# Altium PCB NB3000XN.PcbDoc (part 22 of 71)
Units mil, origin at the board's own origin, x right, y up, seen from the top; angles counter-clockwise.
Board outline 9527.56 x 6929.77 mil, 6 copper layers (Top Layer, GND+SHIELD, MidLayer1, MidLayer2, P2 - 3V3+5V0, Bottom Layer), stack 62.375 mil thick; 832 components, 1027 nets, 4655 pads, 4981 vias.
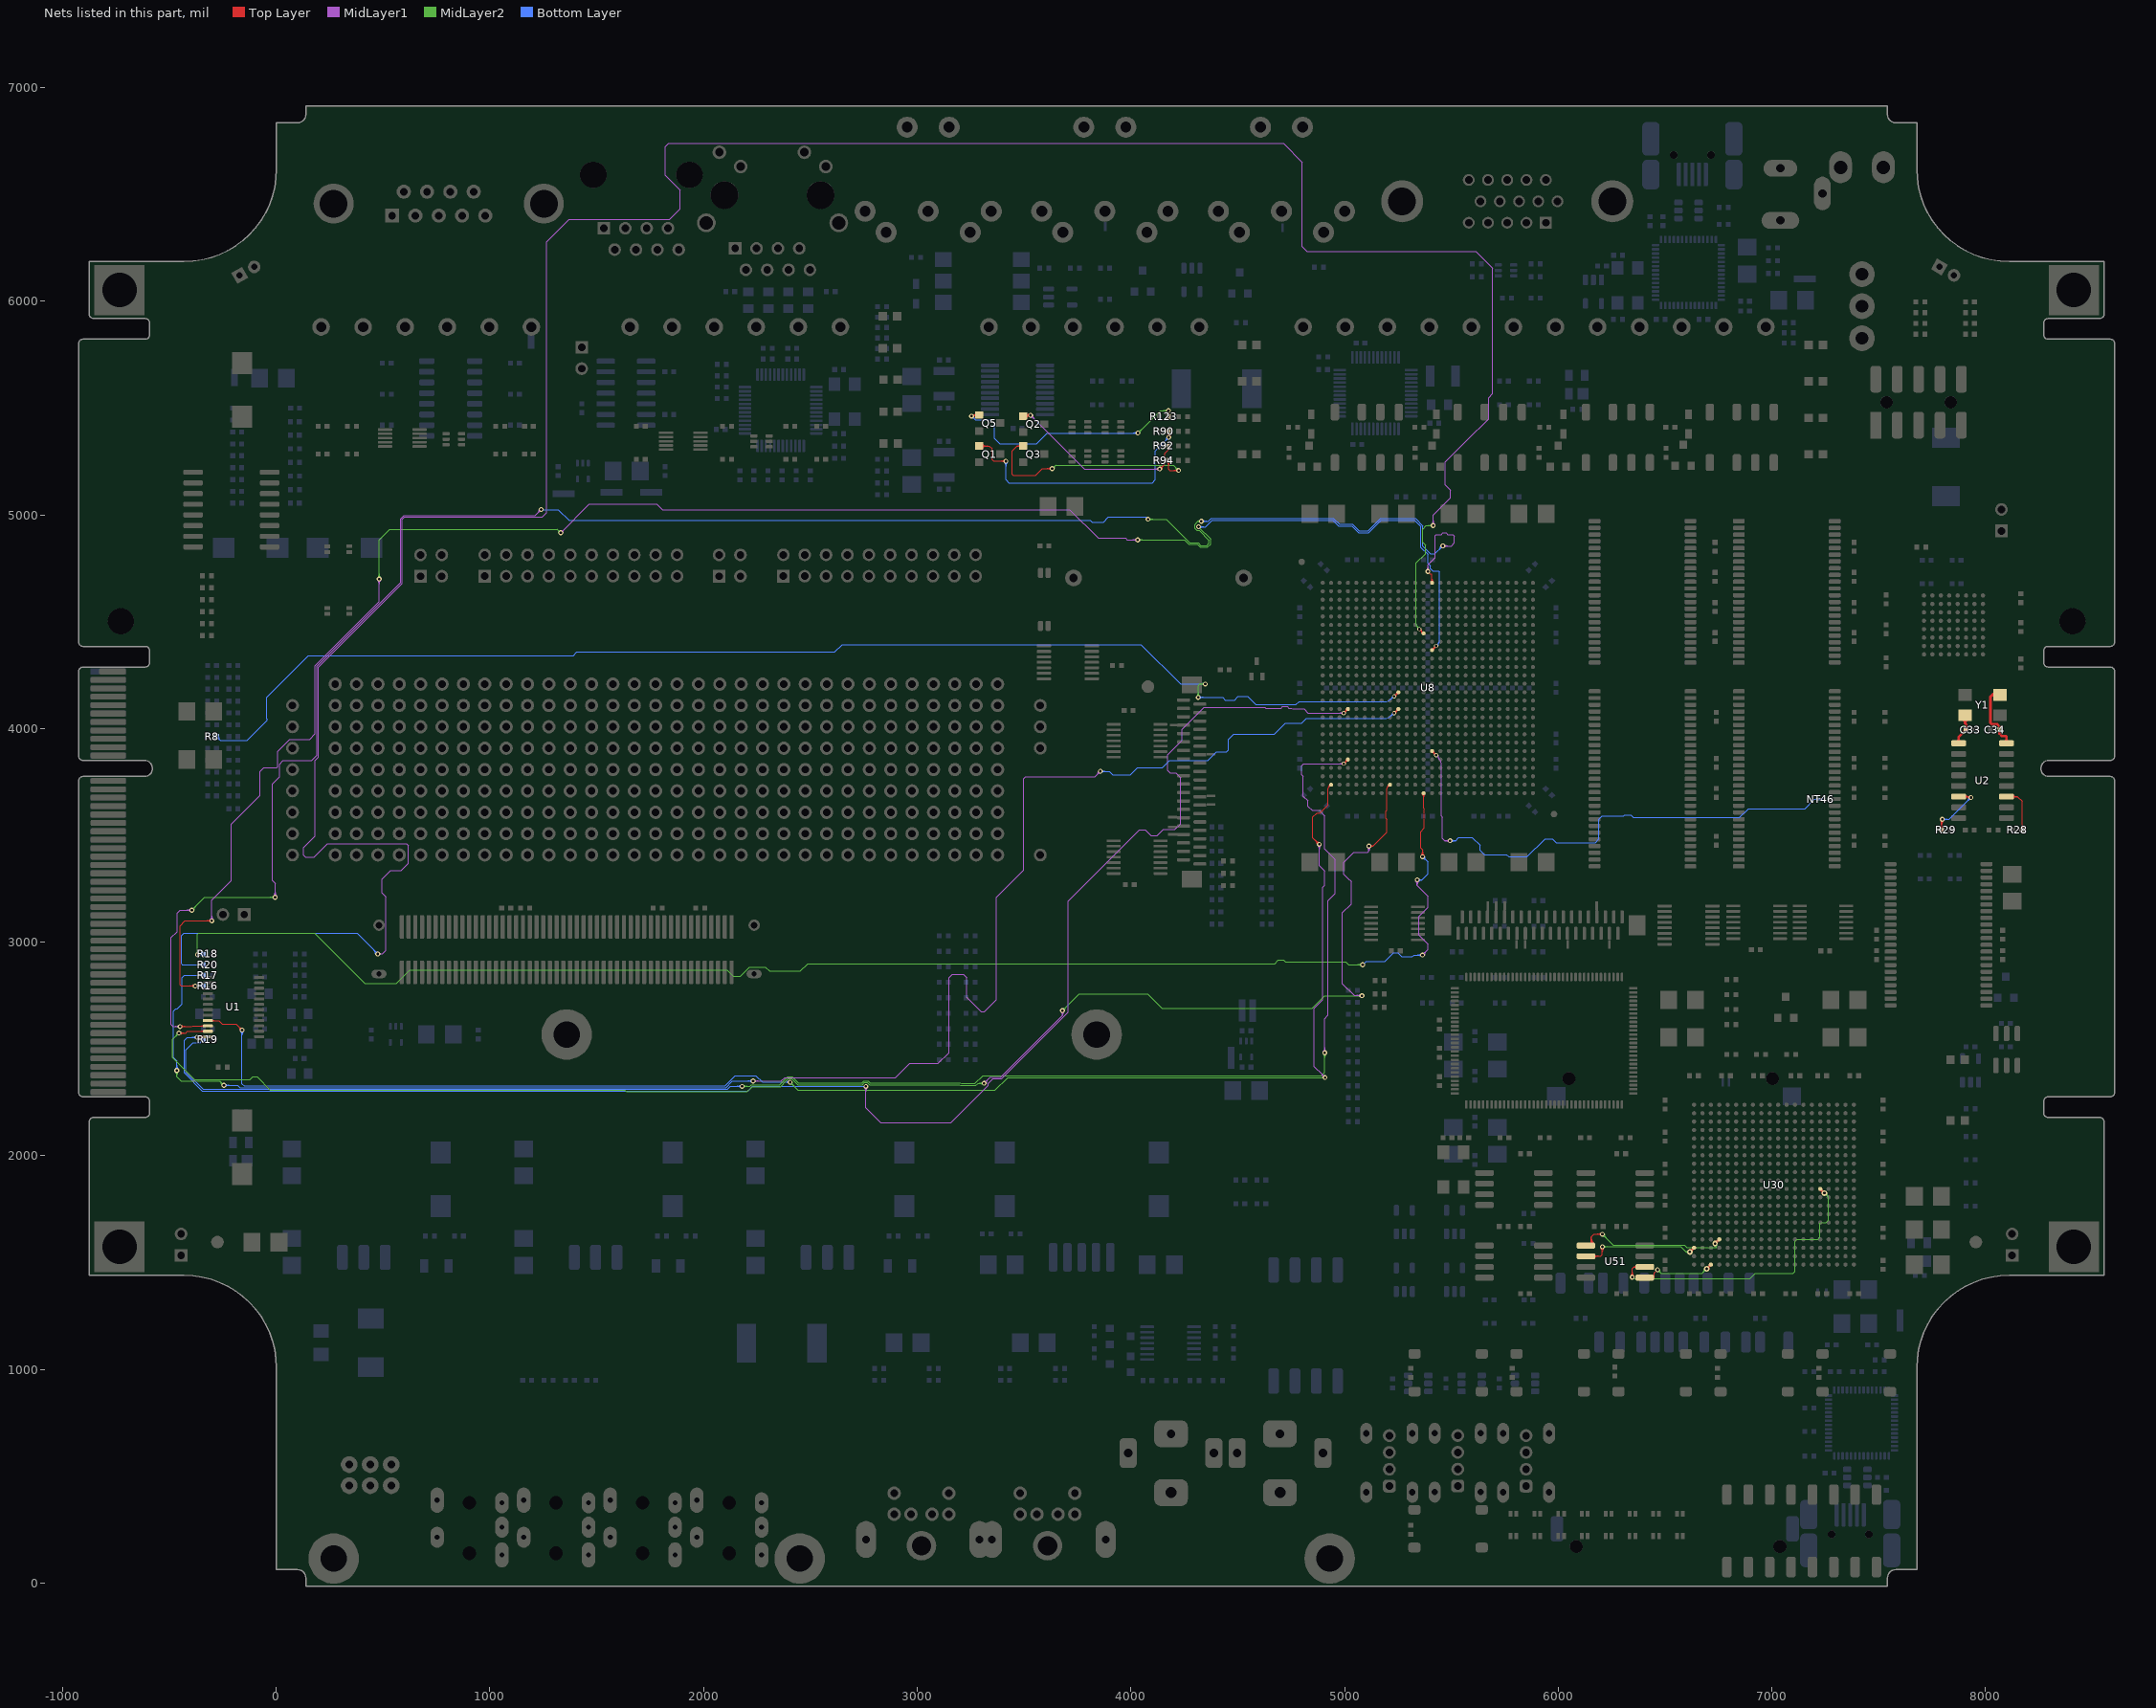
[diagram p26: the nets of this part, all layers, seen from the top]

## Via types
v1: diameter 23, hole 11.81, Top Layer to Bottom Layer, 3672 vias
v2: diameter 26, hole 11.81, Top Layer to Bottom Layer, 461 vias
v3: diameter 19, hole 11.81, Top Layer to Bottom Layer, tented both sides, 396 vias
v4: diameter 23.62, hole 11.81, Top Layer to Bottom Layer, 288 vias
v5: diameter 20, hole 11.81, Top Layer to Bottom Layer, 91 vias
v6: diameter 23, hole 11.81, Top Layer to Bottom Layer, tented both sides, 50 vias
v7: diameter 31, hole 11.81, Top Layer to Bottom Layer, 15 vias
v8: diameter 27.56, hole 11.81, Top Layer to Bottom Layer, tented both sides, 4 vias
v9: diameter 29, hole 11.81, Top Layer to Bottom Layer, 3 vias
v10: diameter 21, hole 11.81, Top Layer to Bottom Layer, 1 vias

## Nets (pads, with @x,y where several pads share a name; then routed paths per layer and width w, separated by ;. In a path a pad name is that pad's centre, name@x,y a point inside that pad or via, vN(x,y) a via of type N, cw(c..) or ccw(c..) an arc to the next point about the centre after c; other vN are vias at no path point) (continued)
BASEA: Q5.1 R123.2 | length 1608.2
  Top Layer w4: v1(3254.52,5462.71) v1@3259.22,5467.4 ; v1@3255.58,5461.65 cw(c3269.48,5447.75) 3269.48,5467.4 ; v1@3258.41,5458.82 cw(c3279.13,5438.1) Q5.1@3279.13,5467.4 ; v1@3261.24,5455.99 cw(c3288.79,5428.44) Q5.1@3288.79,5467.4 ; v1@3261.24,5469.43 ccw(c3266.13,5474.31) 3266.13,5467.4 ; Q5.1@3277.02,5458.25 ccw(c3259.22,5445.5) v1@3259.22,5467.4 ; Q5.1@3277.02,5476.55 cw(c3259.22,5489.3) v1@3259.22,5467.4 ; Q5.1@3280.28,5460.58 ccw(c3267,5451.07) 3267,5467.4 ccw(c3267,5483.73) Q5.1@3280.28,5474.22 ; Q5.1@3290.79,5467.4 v1@3259.22,5467.4 ; R123.2@4169.59,5467.08 ccw(c4153.66,5483.01) v1@4176.19,5483.01 ; v1@4171.65,5479.7 cw(c4167.48,5472.05) 4176.19,5472.05 ; R123.2@4172.42,5464.25 ccw(c4163.32,5473.35) 4176.19,5473.35 ; R123.2@4176.18,5460 4176.18,5472.04 ; 4176.19,5473.31 ccw(c4189,5473.31) R123.2@4179.94,5464.25 ; v1@4176.19,5482.97 ccw(c4198.66,5482.97) R123.2@4182.77,5467.08 ; v1(4176.19,5488.04) 4176.19,5472.05 ; R123.2@4178.17,5469.6 cw(c4178.7,5472.05) 4176.19,5472.05 ; R123.2@4178.15,5469.6 cw(c4178.68,5472.04) 4176.18,5472.04 ; v1@4180.73,5479.7 ccw(c4184.9,5472.05) 4176.19,5472.05 ; 4176.18,5472.04 cw(c4173.68,5472.04) 4174.21,5469.6 ccw(c4173.68,5472.05) 4176.19,5472.05
  MidLayer2 w4: v1(4033.19,5383.37) 4137.86,5488.04 v1(4176.19,5488.04) ; v1@4033.19,5388.87 ccw(c4033.19,5402.15) 4042.58,5392.76 ccw(c4051.97,5383.37) v1@4038.69,5383.37 ; v1@4033.19,5392.87 ccw(c4033.19,5415.81) 4049.41,5399.59 ccw(c4065.63,5383.37) v1@4042.69,5383.37 ; v1@4169.47,5481.32 ccw(c4153.26,5465.11) 4153.26,5488.04 ccw(c4153.26,5510.98) v1@4169.47,5494.76 ; v1@4172.3,5484.15 ccw(c4162.91,5474.76) 4162.91,5488.04 ccw(c4162.91,5501.32) v1@4172.3,5491.93
  Bottom Layer w4: v1@3254.52,5453.21 cw(c3254.52,5430.27) 3270.74,5446.49 cw(c3286.96,5462.71) v1@3264.02,5462.71 ; v1@3254.52,5457.21 cw(c3254.52,5443.93) 3263.91,5453.32 cw(c3273.3,5462.71) v1@3260.02,5462.71 ; v1(3254.52,5462.71) 3272.23,5445 3345,5445 3361.76,5428.24 3361.76,5358.24 3385.72,5334.28 3559.28,5334.28 3608.37,5383.37 v1(4033.19,5383.37) ; v1@4026.47,5376.66 ccw(c4010.26,5360.44) 4010.26,5383.37 ccw(c4010.26,5406.31) v1@4026.47,5390.09 ; v1@4029.3,5379.49 ccw(c4019.91,5370.1) 4019.91,5383.37 ccw(c4019.91,5396.65) v1@4029.3,5387.26
BASEB: Q1.1 R90.2 | length 1645.7
  Top Layer w4: Q1.1@3290.79,5322.4 3337.6,5322.4 3350,5310 3350,5260 3358.29,5251.71 v1(3415.19,5251.71) v1@3414.19,5252.71 ; Q1.1@3297.23,5316.95 cw(c3310.4,5303.77) 3310.4,5322.4 cw(c3310.4,5341.03) Q1.1@3297.23,5327.86 ; Q1.1@3300.06,5314.12 cw(c3320.06,5294.12) 3320.06,5322.4 cw(c3320.06,5350.69) Q1.1@3300.06,5330.69 ; Q1.1@3302.88,5311.29 cw(c3329.71,5284.46) 3329.71,5322.4 cw(c3329.71,5360.34) Q1.1@3302.88,5333.51 ; v1@3408.47,5244.99 ccw(c3392.26,5228.77) 3392.26,5251.71 ccw(c3392.26,5274.64) v1@3408.47,5258.43 ; v1@3411.3,5247.82 ccw(c3401.91,5238.43) 3401.91,5251.71 ccw(c3401.91,5264.99) v1@3411.3,5255.6 ; R90.2@4169.59,5384.59 cw(c4153.68,5368.68) 4176.18,5368.68 cw(c4198.68,5368.68) R90.2@4182.77,5384.59 ; v1@4170.81,5369.43 ccw(c4157.83,5382.4) R90.2@4176.18,5382.4 ; R90.2@4172.42,5387.41 cw(c4163.34,5378.33) 4176.18,5378.33 cw(c4189.02,5378.33) R90.2@4179.94,5387.41 ; 4176.18,5379.23 ccw(c4194.04,5379.23) v1@4181.41,5366.6 ; R90.2@4176.18,5388.89 ccw(c4203.7,5388.89) v1@4184.24,5369.43 ; R90.2@4176.18,5391.67 4176.18,5364.05 v1(4177.52,5362.71)
  Bottom Layer w4: v1@3408.47,5244.99 cw(c3392.26,5228.77) 3415.19,5228.77 cw(c3438.13,5228.77) v1@3421.91,5244.99 ; v1@3411.3,5247.82 cw(c3401.91,5238.43) 3415.19,5238.43 cw(c3428.47,5238.43) v1@3419.08,5247.82 ; v1(3415.19,5251.71) 3415.19,5164.81 3429.81,5150.19 4099.81,5150.19 4115,5165.38 4115,5300.18 v1(4177.52,5362.71) ; v1@4168.02,5362.71 cw(c4145.09,5362.71) 4161.31,5346.49 cw(c4177.52,5330.27) v1@4177.52,5353.21 ; v1@4172.02,5362.71 cw(c4158.75,5362.71) 4168.14,5353.32 cw(c4177.52,5343.93) v1@4177.52,5357.21
BASEC: Q2.1 R92.2 | length 1203.4
  Top Layer w4: Q2.1@3495.79,5462.4 v1@3526.22,5462.4 ; Q2.1@3497.19,5462.4 ccw(c3497.19,5500.04) v1@3523.81,5473.43 ; Q2.1@3506.51,5455.88 cw(c3518.72,5447.7) 3518.72,5462.4 cw(c3518.72,5477.11) Q2.1@3506.51,5468.92 ; Q2.1@3506.85,5462.4 ccw(c3506.85,5490.38) v1@3526.64,5470.6 ; Q2.1@3509.83,5453.66 cw(c3526.22,5442.68) v1@3526.22,5462.4 ; Q2.1@3509.83,5471.15 ccw(c3526.22,5482.13) v1@3526.22,5462.4 ; 3516.51,5462.4 ccw(c3516.51,5480.72) v1@3529.46,5467.77 ; 3517.98,5462.4 cw(c3517.98,5454.17) v1@3523.81,5459.99 ; v1(3530.52,5466.71) v1@3526.22,5462.4 ; v1(4135.19,5215.04) 4158.19,5238.04 4158.19,5287.72 4176.18,5305.71 ; v1@4135.19,5220.54 ccw(c4135.19,5233.82) 4144.58,5224.43 ccw(c4153.97,5215.04) v1@4140.69,5215.04 ; v1@4135.19,5224.54 ccw(c4135.19,5247.48) 4151.41,5231.26 ccw(c4167.63,5215.04) v1@4144.69,5215.04 ; R92.2@4171.12,5315.02 cw(c4165.09,5305.71) 4176.18,5305.71 ; R92.2@4176.18,5323.33 4176.18,5305.71 ; R92.2@4181.24,5315.02 ccw(c4187.27,5305.71) 4176.18,5305.71
  MidLayer1 w4: v1@3530.52,5457.21 cw(c3530.52,5434.27) 3546.74,5450.49 cw(c3562.96,5466.71) v1@3540.02,5466.71 ; v1@3530.52,5461.21 cw(c3530.52,5447.93) 3539.91,5457.32 cw(c3549.3,5466.71) v1@3536.02,5466.71 ; v1(3530.52,5466.71) 3782.19,5215.04 v1(4135.19,5215.04) ; v1@4128.47,5208.32 ccw(c4112.26,5192.11) 4112.26,5215.04 ccw(c4112.26,5237.98) v1@4128.47,5221.76 ; v1@4131.3,5211.15 ccw(c4121.91,5201.76) 4121.91,5215.04 ccw(c4121.91,5228.32) v1@4131.3,5218.93
BASED: Q3.1 R94.2 | length 1413.2
  Top Layer w4: Q3.1@3481.24,5314.47 ccw(c3467.4,5306.37) 3467.4,5322.4 ; Q3.1@3481.24,5330.34 cw(c3467.4,5338.43) 3467.4,5322.4 ; Q3.1@3484.69,5316.49 ccw(c3474.38,5310.45) 3474.38,5322.4 ccw(c3474.38,5334.35) Q3.1@3484.69,5328.32 ; Q3.1@3495.79,5322.4 3467.4,5322.4 ; v1@3625.14,5209.99 ccw(c3608.92,5193.77) 3608.92,5216.71 ccw(c3608.92,5239.64) v1@3625.14,5223.43 ; v1@3627.97,5212.82 ccw(c3618.58,5203.43) 3618.58,5216.71 ccw(c3618.58,5229.99) v1@3627.97,5220.6 ; v1(3631.86,5216.71) 3586.71,5216.71 3555,5185 3450,5185 3445,5190 3445,5300 3467.4,5322.4 ; R94.2@4169.59,5247.92 cw(c4153.68,5232.01) 4176.18,5232.01 cw(c4198.68,5232.01) R94.2@4182.77,5247.92 ; R94.2@4172.42,5250.75 cw(c4163.34,5241.67) 4176.18,5241.67 cw(c4189.02,5241.67) R94.2@4179.94,5250.75 ; R94.2@4176.18,5255 4176.18,5213.82 4181.63,5208.37 v1(4223.52,5208.37) ; v1@4216.81,5201.66 ccw(c4200.59,5185.44) 4200.59,5208.37 ccw(c4200.59,5231.31) v1@4216.81,5215.09 ; v1@4219.64,5204.49 ccw(c4210.25,5195.1) 4210.25,5208.37 ccw(c4210.25,5221.65) v1@4219.64,5212.26
  MidLayer2 w4: v1(3631.86,5216.71) 3648.52,5233.37 4198.52,5233.37 v1(4223.52,5208.37) ; v1@3631.86,5222.21 ccw(c3631.86,5235.49) 3641.25,5226.1 ccw(c3650.64,5216.71) v1@3637.36,5216.71 ; v1@3631.86,5226.21 ccw(c3631.86,5249.14) 3648.07,5232.93 ccw(c3664.29,5216.71) v1@3641.36,5216.71 ; v1@4214.02,5208.37 ccw(c4191.09,5208.37) 4207.31,5224.59 ccw(c4223.52,5240.81) v1@4223.52,5217.87 ; v1@4218.02,5208.37 ccw(c4204.75,5208.37) 4214.14,5217.76 ccw(c4223.52,5227.15) v1@4223.52,5213.87
BOOT_FLASH.DIN: U30.V20 U51.5 | length 550.9
  Top Layer w4: U51.5@6405.59,1430 6449.79,1430 ; U51.5@6446.62,1427.45 cw(c6449.79,1426.75) 6449.79,1430 ; U51.5@6446.62,1432.55 ccw(c6449.79,1433.25) 6449.79,1430 ; v1(6465.19,1466.71) 6449.79,1451.31 6449.79,1430
  Top Layer w8: v2(6695.04,1471.3) U30.V20@6714.72,1490.98 ; v2@6695.04,1480.3 ccw(c6695.04,1502.03) 6710.4,1486.66 ccw(c6725.77,1471.3) v2@6704.04,1471.3 ; U30.V20@6708.88,1490.98 cw(c6694.78,1490.98) 6704.75,1481.01 cw(c6714.72,1471.04) U30.V20@6714.72,1485.14
  MidLayer2 w4: v1@6465.19,1457.21 cw(c6465.19,1434.27) 6481.41,1450.49 cw(c6497.63,1466.71) v1@6474.69,1466.71 ; v1@6465.19,1461.21 cw(c6465.19,1447.93) 6474.58,1457.32 cw(c6483.97,1466.71) v1@6470.69,1466.71 ; v1(6465.19,1466.71) 6481.86,1450.04 6673.78,1450.04 v2(6695.04,1471.3) ; 6683.09,1459.35 ccw(c6671.14,1471.3) v2@6688.04,1471.3 ; 6683.09,1459.35 cw(c6695.04,1447.4) v2@6695.04,1464.3 ; v2@6684.04,1471.3 cw(c6657.48,1471.3) 6676.26,1452.52 cw(c6695.04,1433.75) v2@6695.04,1460.3
BOOT_FLASH.DOUT: U30.Y18 U51.2 | length 828.4
  Top Layer w4: U51.2@6130,1530 6200,1530 6206.86,1536.86 v1(6206.86,1574.37) ; U51.2@6165.03,1524.5 cw(c6178.31,1511.22) 6178.31,1530 cw(c6178.31,1548.78) U51.2@6165.03,1535.5 ; U51.2@6167.86,1521.67 cw(c6187.97,1501.56) 6187.97,1530 cw(c6187.97,1558.44) U51.2@6167.86,1538.33 ; v1@6200.14,1567.66 cw(c6183.92,1551.44) 6206.86,1551.44 cw(c6229.79,1551.44) v1@6213.57,1567.66 ; v1@6202.97,1570.49 cw(c6193.58,1561.1) 6206.86,1561.1 cw(c6220.14,1561.1) v1@6210.75,1570.49
  Top Layer w8: v2(6616.3,1550.04) U30.Y18@6635.98,1569.72 ; v2@6616.3,1559.04 ccw(c6616.3,1580.77) 6631.66,1565.4 ccw(c6647.03,1550.04) v2@6625.3,1550.04 ; U30.Y18@6630.14,1569.72 cw(c6616.04,1569.72) 6626.01,1559.75 cw(c6635.98,1549.78) U30.Y18@6635.98,1563.88
  MidLayer2 w4: v1(6206.86,1574.37) 6574.19,1574.37 6598.52,1550.04 ; v1@6210.75,1570.49 cw(c6220.14,1561.1) 6220.14,1574.37 cw(c6220.14,1587.65) v1@6210.75,1578.26 ; v1@6213.57,1567.66 cw(c6229.79,1551.44) 6229.79,1574.37 cw(c6229.79,1597.31) v1@6213.57,1581.09 ; v2@6606.45,1545.13 ccw(c6598.52,1541.18) 6598.52,1550.04 ; v2@6606.45,1554.95 cw(c6598.52,1558.9) 6598.52,1550.04 ; v2(6616.3,1550.04) 6598.52,1550.04
BOOT_FLASH.FLASH_CS_N: U30.U17 U51.1 | length 1022.1
  Top Layer w4: U51.1@6130,1580 6154.52,1580 6154.52,1619.52 ; U51.1@6151.2,1588.33 ccw(c6143.17,1596.36) 6154.52,1596.36 ; 6154.52,1600.68 ccw(c6179.49,1600.68) U51.1@6162.15,1582.72 ; 6154.52,1610.1 ccw(c6188.58,1610.1) U51.1@6164.93,1585.6 ; U51.1@6167.71,1588.48 cw(c6197.67,1619.52) 6154.52,1619.52 ; v1@6200.14,1626.66 ccw(c6183.92,1610.44) 6183.92,1633.37 ccw(c6183.92,1656.31) v1@6200.14,1640.09 ; v1@6202.97,1629.49 ccw(c6193.58,1620.1) 6193.58,1633.37 ccw(c6193.58,1646.65) v1@6202.97,1637.26 ; v1(6206.86,1633.37) 6168.37,1633.37 6154.52,1619.52
  Top Layer w8: v2(6734.41,1589.41) U30.U17@6754.09,1609.09 ; v2@6734.41,1598.41 ccw(c6734.41,1620.14) 6749.77,1604.77 ccw(c6765.14,1589.41) v2@6743.41,1589.41 ; U30.U17@6748.25,1609.09 cw(c6734.15,1609.09) 6744.12,1599.12 cw(c6754.09,1589.15) U30.U17@6754.09,1603.25
  MidLayer2 w4: v1@6206.86,1623.87 cw(c6206.86,1600.94) 6223.07,1617.16 cw(c6239.29,1633.37) v1@6216.36,1633.37 ; v1@6206.86,1627.87 cw(c6206.86,1614.6) 6216.25,1623.99 cw(c6225.64,1633.37) v1@6212.36,1633.37 ; v1(6206.86,1633.37) 6257.52,1582.71 6590.19,1582.71 6602.86,1570.04 6738.52,1570.04 6740.19,1571.71 6740.19,1589.41 v2(6734.41,1589.41) ; v2@6733.27,1578.47 cw(c6732.47,1570.79) 6740.19,1570.79 ; v2@6733.68,1582.45 cw(c6732.93,1575.23) 6740.19,1575.23 ; 6740.19,1576.81 cw(c6747.01,1576.81) v2@6742.19,1581.63
BOOT_FLASH.SCLK: U30.E11 U51.6 | length 1649.6
  Top Layer w4: v1@6339.47,1439.09 ccw(c6323.26,1455.31) 6346.19,1455.31 ccw(c6369.13,1455.31) v1@6352.91,1439.09 ; v1@6342.3,1436.26 ccw(c6332.91,1445.65) 6346.19,1445.65 ccw(c6359.47,1445.65) v1@6350.08,1436.26 ; v1(6346.19,1432.37) 6346.19,1472 6354.19,1480 ; U51.6@6366.23,1473.52 ccw(c6354.19,1465.58) 6354.19,1480 ; U51.6@6366.23,1486.48 cw(c6354.19,1494.42) 6354.19,1480 ; U51.6@6369.57,1475.72 ccw(c6361.62,1470.48) 6361.62,1480 ccw(c6361.62,1489.52) U51.6@6369.57,1484.28 ; U51.6@6405.59,1480 6354.19,1480
  Top Layer w8: U30.E11@7226.54,1839.47 cw(c7226.54,1825.37) 7236.51,1835.34 cw(c7246.48,1845.31) U30.E11@7232.38,1845.31 ; U30.E11@7226.54,1845.31 v2(7246.22,1825.63) ; v2@7237.22,1825.63 ccw(c7215.49,1825.63) 7230.86,1840.99 ccw(c7246.22,1856.36) v2@7246.22,1834.63
  MidLayer2 w4: v1(6346.19,1432.37) 6353.52,1425.04 6898.52,1425.04 6923.52,1450.04 7100.19,1450.04 7108.52,1458.37 7108.52,1600 7118.3,1609.78 7214.78,1609.78 7225.85,1620.85 7225.85,1685.85 7228.52,1688.52 7254.09,1688.52 7265.22,1699.65 7265.22,1806.63 v2(7246.22,1825.63) ; v2@7246.22,1814.63 cw(c7246.22,1788.07) 7265,1806.85 cw(c7283.78,1825.63) v2@7257.22,1825.63 ; v2@7246.22,1818.63 cw(c7246.22,1801.73) 7258.17,1813.68 cw(c7270.12,1825.63) v2@7253.22,1825.63
BUS_SDRAM_FEEDBACK: NT46.1 U8.AA14 | length 2690.9
  Top Layer w4: U8.AA14@5409.69,3887.22 cw(c5409.69,3869.12) 5422.49,3881.92 cw(c5435.29,3894.72) U8.AA14@5417.19,3894.72 ; U8.AA14@5409.69,3887.38 cw(c5409.69,3869.66) 5422.22,3882.19 cw(c5434.75,3894.72) U8.AA14@5417.03,3894.72 ; U8.AA14@5409.69,3894.72 v3(5429.37,3875.04) ; 5416.57,3887.84 cw(c5403.76,3875.04) 5421.87,3875.04 ccw(c5403.76,3875.04) 5416.57,3887.84 ; 5416.57,3887.84 ccw(c5429.37,3900.65) 5429.37,3882.54 cw(c5429.37,3900.65) 5416.57,3887.84
  MidLayer1 w4: v3@5428.72,3867.57 cw(c5427.14,3849.53) 5441.01,3861.17 ; v3@5436.84,3874.39 ccw(c5454.88,3872.81) 5441.01,3861.17 ; v1@5487.81,3468.32 ccw(c5471.59,3452.11) 5471.59,3475.04 ccw(c5471.59,3497.98) v1@5487.81,3481.76 ; v1@5490.64,3471.15 ccw(c5481.25,3461.76) 5481.25,3475.04 ccw(c5481.25,3488.32) v1@5490.64,3478.93 ; v1(5494.52,3475.04) 5469.96,3475.04 5458.5,3486.5 5458.5,3585.18 5453.23,3590.45 5453.23,3660 5453.23,3670 5453.23,3738.04 5453.23,3812.16 5453.23,3831.66 ccw(c5411.5,3831.66) 5441.01,3861.17
  Bottom Layer w4: v1(5494.52,3475.04) 5520.04,3475.04 5535,3490 5597.27,3490 5633.9,3453.37 5633.9,3429.79 5654.6,3409.08 5759.13,3409.08 5768.17,3400.04 5855,3400.04 5938.83,3483.87 5973.34,3483.87 5991.17,3466.04 6173.52,3466.04 6190.19,3482.71 6190.19,3575.04 6206.86,3591.71 6306.86,3591.71 6310.15,3595 6340,3595 6351.63,3583.37 6848.52,3583.37 6890.19,3625.04 7155.04,3625.04 7199,3669 NT46.1@7219,3669 ; v1@5498.41,3471.15 cw(c5507.8,3461.76) 5507.8,3475.04 cw(c5507.8,3488.32) v1@5498.41,3478.93 ; v1@5501.24,3468.32 cw(c5517.46,3452.11) 5517.46,3475.04 cw(c5517.46,3497.98) v1@5501.24,3481.76 ; NT46.1@7211.67,3666.17 ccw(c7204.84,3659.34) 7204.84,3669 ccw(c7204.84,3678.66) NT46.1@7211.67,3671.83
BUZZER: R8.1 U8.P10 | length 6445.2
  Top Layer w4: v3(5232.52,4150.63) U8.P10@5252.2,4170.31 ; U8.P10@5244.7,4170.31 cw(c5226.6,4170.31) 5239.4,4157.51 cw(c5252.2,4144.71) U8.P10@5252.2,4162.81 ; U8.P10@5244.86,4170.31 cw(c5227.14,4170.31) 5239.67,4157.78 cw(c5252.2,4145.25) U8.P10@5252.2,4162.97 ; 5245.32,4163.43 cw(c5232.52,4176.24) 5232.52,4158.13 ccw(c5232.52,4176.24) 5245.32,4163.43 ; 5245.32,4163.43 ccw(c5258.13,4150.63) 5240.02,4150.63 cw(c5258.13,4150.63) 5245.32,4163.43
  MidLayer2 w4: v1@4308.47,4152.43 ccw(c4292.26,4168.64) 4315.19,4168.64 ccw(c4338.13,4168.64) v1@4321.91,4152.43 ; v1@4311.3,4149.6 ccw(c4301.91,4158.99) 4315.19,4158.99 ccw(c4328.47,4158.99) v1@4319.08,4149.6 ; v1(4315.19,4145.71) 4315.19,4200.19 4323.37,4208.37 v1(4348.52,4208.37) ; v1@4341.81,4201.66 ccw(c4325.59,4185.44) 4325.59,4208.37 ccw(c4325.59,4231.31) v1@4341.81,4215.09 ; v1@4344.64,4204.49 ccw(c4335.25,4195.1) 4335.25,4208.37 ccw(c4335.25,4221.65) v1@4344.64,4212.26
  Bottom Layer w4: R8.1@-278.82,3952.46 cw(c-278.82,3928.78) -262.07,3945.52 ; R8.1@-278.82,3956.46 cw(c-278.82,3942.43) R8.1@-268.9,3952.35 ; R8.1@-278.82,3962.27 -261.01,3944.46 -136.08,3944.46 -42.65,4037.9 -42.65,4044.19 -43.48,4045.02 -43.48,4146.73 151.51,4341.71 1390.19,4341.71 1406.86,4358.37 2615,4358.37 2648.67,4392.04 4048.23,4392.04 4231.9,4208.37 v1(4348.52,4208.37) ; R8.1@-273.5,3961.78 ccw(c-261.85,3961.78) R8.1@-270.09,3953.54 ; R8.1@-269.5,3961.78 ccw(c-248.19,3961.78) -263.26,3946.71 ; v1(4315.19,4145.71) 4429.33,4145.71 4441.33,4133.71 4485.17,4133.71 4501.5,4150.04 4545.54,4150.04 4583.67,4111.92 4773.38,4111.92 4788.23,4126.77 4860,4126.77 4870,4126.77 5076.1,4126.77 5095.52,4126.77 5169.64,4126.77 5189.14,4126.77 ccw(c5189.14,4168.5) 5218.65,4138.99 ; v1@4319.08,4141.82 cw(c4328.47,4132.43) 4328.47,4145.71 cw(c4328.47,4158.99) v1@4319.08,4149.6 ; v1@4321.91,4138.99 cw(c4338.13,4122.77) 4338.13,4145.71 cw(c4338.13,4168.64) v1@4321.91,4152.43 ; v1@4341.81,4201.66 ccw(c4325.59,4185.44) 4325.59,4208.37 ccw(c4325.59,4231.31) v1@4341.81,4215.09 ; v1@4344.64,4204.49 ccw(c4335.25,4195.1) 4335.25,4208.37 ccw(c4335.25,4221.65) v1@4344.64,4212.26 ; v3@5225.05,4151.28 cw(c5207.01,4152.86) 5218.65,4138.99 ; v3@5231.87,4143.16 ccw(c5230.29,4125.12) 5218.65,4138.99
CLK_ADJ_X1: C33.1 U2.1 Y1.1 | length 268.3
  Top Layer w12: U2.1@7868.67,3936.84 ccw(c7855.39,3950.12) 7874.17,3950.12 ccw(c7892.95,3950.12) U2.1@7879.67,3936.84 ; U2.1@7874.17,3931.34 7874.17,3959.84 C33.1@7909.33,3995 7909.33,4020 7904.88,4024.45 ; Y1.1@7893.79,4044.08 cw(c7881.97,4024.45) 7904.88,4024.45 ; C33.1@7903.52,3995 cw(c7889.49,3995) 7899.41,3985.08 cw(c7909.33,3975.16) C33.1@7909.33,3989.19 ; Y1.1@7904.88,4062.5 7904.88,4024.45 ; C33.1@7905.22,3999.11 ccw(c7895.3,4009.03) 7909.33,4009.03 ccw(c7923.36,4009.03) C33.1@7913.44,3999.11 ; Y1.1@7915.97,4044.08 ccw(c7927.79,4024.45) 7904.88,4024.45
CLK_ADJ_X2: C34.1 U2.16 Y1.3 | length 554.6
  Top Layer w12: 8024.1,4150.07 cw(c8040.99,4133.17) Y1.3@8057.37,4150.58 ; 8029.17,4155.15 cw(c8050.06,4134.26) Y1.3@8065.16,4159.65 ; 8032.85,4158.82 cw(c8049.48,4142.19) Y1.3@8065.59,4159.32 ; Y1.3@8044.06,4149.17 ccw(c8031.53,4143.91) 8031.53,4157.5 ; Y1.3@8044.06,4165.83 cw(c8031.53,4171.09) 8031.53,4157.5 ; C34.1@8061.56,3990.89 cw(c8051.64,3980.97) 8065.67,3980.97 cw(c8079.7,3980.97) C34.1@8069.78,3990.89 ; C34.1@8061.56,3999.11 ccw(c8051.64,4009.03) 8065.67,4009.03 ccw(c8079.7,4009.03) C34.1@8069.78,3999.11 ; 8066.65,4008.35 cw(c8054.02,3995.72) C34.1@8071.85,3994.62 ; Y1.3@8067.88,4157.5 8031.52,4157.5 ; U2.16@8093.08,3936.84 ccw(c8079.8,3950.12) 8098.58,3950.12 ccw(c8117.36,3950.12) U2.16@8104.08,3936.84 ; U2.16@8098.58,3931.34 8098.58,3961.42 8095,3965 8077.29,3965 8065.67,3976.62 C34.1@8065.67,3995 8065.67,4009.33 8055,4020 8030,4020 8023.52,4026.48 8023.52,4149.5 8031.52,4157.5
CLK_FIXED#: R29.2 U2.6 | length 669.3
  Top Layer w4: R29.2@7787.23,3532.08 ccw(c7771.32,3547.99) 7793.82,3547.99 ccw(c7816.32,3547.99) R29.2@7800.41,3532.08 ; R29.2@7790.06,3529.25 ccw(c7780.98,3538.33) 7793.82,3538.33 ccw(c7806.66,3538.33) R29.2@7797.58,3529.25 ; v1@7790.81,3568.32 cw(c7783.53,3561.05) 7793.82,3561.05 ; R29.2@7793.82,3525 7793.82,3571.34 v1(7797.52,3575.04) ; 7793.82,3543.16 cw(c7829.4,3543.16) v1@7804.24,3568.32 ; 7793.82,3552.82 cw(c7819.75,3552.82) v1@7801.41,3571.15 ; 7793.82,3562.47 cw(c7810.09,3562.47) v1@7798.58,3573.98 ; U2.6@7874.17,3681.34 v1@7923.82,3681.34 ; U2.6@7899.35,3681.34 cw(c7899.35,3644.87) v1@7925.14,3670.66 ; U2.6@7901.39,3675.9 cw(c7914.31,3663.26) 7914.31,3681.34 cw(c7914.31,3699.42) U2.6@7901.39,3686.78 ; U2.6@7904.25,3673.1 cw(c7923.82,3653.97) v1@7923.82,3681.34 ; U2.6@7904.25,3689.57 ccw(c7923.82,3708.71) v1@7923.82,3681.34 ; U2.6@7909.01,3681.34 cw(c7909.01,3654.53) v1@7927.97,3673.49 ; 7918.49,3681.34 ccw(c7918.49,3690.74) v1@7925.14,3684.09 ; 7918.67,3681.34 cw(c7918.67,3664.18) v1@7930.8,3676.31 ; v1(7931.86,3677.37) 7927.52,3681.71 7924.19,3681.71 v1@7923.82,3681.34
  Bottom Layer w4: v1(7797.52,3575.04) 7829.52,3575.04 v1(7931.86,3677.37) ; v1@7801.41,3571.15 cw(c7810.8,3561.76) 7810.8,3575.04 cw(c7810.8,3588.32) v1@7801.41,3578.93 ; v1@7804.24,3568.32 cw(c7820.46,3552.11) 7820.46,3575.04 cw(c7820.46,3597.98) v1@7804.24,3581.76 ; v1@7922.36,3677.37 cw(c7899.42,3677.37) 7915.64,3661.16 cw(c7931.86,3644.94) v1@7931.86,3667.87 ; v1@7926.36,3677.37 cw(c7913.08,3677.37) 7922.47,3667.99 cw(c7931.86,3658.6) v1@7931.86,3671.87
CLK_PROG#: R28.2 U2.11 | length 346.5
  Top Layer w4: U2.11@8098.58,3681.34 8150.56,3681.34 8171.18,3660.72 R28.2@8171.18,3525 ; U2.11@8125.74,3675.84 cw(c8139.02,3662.56) 8139.02,3681.34 cw(c8139.02,3700.12) U2.11@8125.74,3686.84 ; U2.11@8128.57,3673.01 cw(c8148.67,3652.9) 8148.67,3681.34 cw(c8148.67,3709.78) U2.11@8128.57,3689.67 ; R28.2@8164.59,3532.08 ccw(c8148.68,3547.99) 8171.18,3547.99 ccw(c8193.68,3547.99) R28.2@8177.77,3532.08 ; R28.2@8167.42,3529.25 ccw(c8158.34,3538.33) 8171.18,3538.33 ccw(c8184.02,3538.33) R28.2@8174.94,3529.25
CODEC.I2S_BCLK: R16.2 U8.J14 | length 9481.9
  Top Layer w4: v1@-385.9,2788.28 ccw(c-402.11,2772.06) -402.11,2795 ccw(c-402.11,2817.93) v1@-385.9,2801.72 ; v1@-383.07,2791.11 ccw(c-392.46,2781.72) -392.46,2795 ccw(c-392.46,2808.28) v1@-383.07,2798.89 ; v1(-379.18,2795) -445,2795 -450,2800 -450,3076.52 -426.48,3100.04 v1(-301.48,3100.04) ; v1@-308.19,3093.32 ccw(c-324.41,3077.11) -324.41,3100.04 ccw(c-324.41,3122.98) v1@-308.19,3106.76 ; v1@-305.36,3096.15 ccw(c-314.75,3086.76) -314.75,3100.04 ccw(c-314.75,3113.32) v1@-305.36,3103.93 ; U8.J14@5409.69,4367.17 v3(5429.37,4386.85) ; U8.J14@5409.69,4374.51 ccw(c5409.69,4392.23) 5422.22,4379.7 ccw(c5434.75,4367.17) U8.J14@5417.03,4367.17 ; U8.J14@5409.69,4374.67 ccw(c5409.69,4392.77) 5422.49,4379.97 ccw(c5435.29,4367.17) U8.J14@5417.19,4367.17 ; 5416.57,4374.05 cw(c5429.37,4361.24) 5429.37,4379.35 ccw(c5429.37,4361.24) 5416.57,4374.05 ; 5416.57,4374.05 ccw(c5403.76,4386.85) 5421.87,4386.85 cw(c5403.76,4386.85) 5416.57,4374.05
  MidLayer1 w4: v1@-308.19,3106.76 ccw(c-324.41,3122.98) -301.48,3122.98 ccw(c-278.54,3122.98) v1@-294.76,3106.76 ; v1@-305.36,3103.93 ccw(c-314.75,3113.32) -301.48,3113.32 ccw(c-288.2,3113.32) v1@-297.59,3103.93 ; v1(-301.48,3100.04) -301.48,3197.06 -210,3288.54 -210,3552.37 -80.21,3682.16 -75.3,3687.07 -75.3,3790 ; -75,3790 -75,3800 -58.29,3816.71 1.71,3816.71 7.19,3822.19 7.19,3893.67 63.56,3950.04 156.86,3950.04 181.86,3975.04 181.86,4294.69 481.86,4594.69 v1(481.86,4700.04) ; v1@475.14,4693.32 cw(c458.92,4677.11) 481.86,4677.11 cw(c504.79,4677.11) v1@488.57,4693.32 ; v1@477.97,4696.15 cw(c468.58,4686.76) 481.86,4686.76 cw(c495.14,4686.76) v1@485.75,4696.15 ; v1(1331.86,4916.71) 1465.19,5050.04 1781.86,5050.04 1806.86,5025.04 3713.65,5025.04 3846.98,4891.71 3974.51,4891.71 3982.84,4883.37 v1(4031.86,4883.37) ; v1@1331.86,4922.21 ccw(c1331.86,4935.49) 1341.25,4926.1 ccw(c1350.64,4916.71) v1@1337.36,4916.71 ; v1@1331.86,4926.21 ccw(c1331.86,4949.14) 1348.07,4932.93 ccw(c1364.29,4916.71) v1@1341.36,4916.71 ; v1@4025.14,4876.66 ccw(c4008.92,4860.44) 4008.92,4883.37 ccw(c4008.92,4906.31) v1@4025.14,4890.09 ; v1@4027.97,4879.49 ccw(c4018.58,4870.1) 4018.58,4883.37 ccw(c4018.58,4896.65) v1@4027.97,4887.26
  MidLayer2 w4: v1@475.14,4706.76 ccw(c458.92,4722.98) 481.86,4722.98 ccw(c504.79,4722.98) v1@488.57,4706.76 ; v1@477.97,4703.93 ccw(c468.58,4713.32) 481.86,4713.32 ccw(c495.14,4713.32) v1@485.75,4703.93 ; v1(481.86,4700.04) 481.86,4883.37 531.86,4933.37 1315.19,4933.37 v1(1331.86,4916.71) ; v1@1322.36,4916.71 ccw(c1299.42,4916.71) 1315.64,4932.93 ccw(c1331.86,4949.14) v1@1331.86,4926.21 ; v1@1326.36,4916.71 ccw(c1313.08,4916.71) 1322.47,4926.1 ccw(c1331.86,4935.49) v1@1331.86,4922.21 ; v1(4031.86,4883.37) 4250.31,4883.37 4271.69,4862 4311.56,4862 4324.69,4848.87 4359.09,4848.87 4374.02,4863.81 4374.02,4887.35 v1(4316.85,4944.52) ; v1@4035.75,4879.49 cw(c4045.14,4870.1) 4045.14,4883.37 cw(c4045.14,4896.65) v1@4035.75,4887.26 ; v1@4038.57,4876.66 cw(c4054.79,4860.44) 4054.79,4883.37 cw(c4054.79,4906.31) v1@4038.57,4890.09
  Bottom Layer w4: v1(-379.18,2795) R16.2@-341.18,2795 ; v1@-375.29,2791.11 cw(c-365.9,2781.72) -365.9,2795 cw(c-365.9,2808.28) v1@-375.29,2798.89 ; v1@-372.46,2788.28 cw(c-356.24,2772.06) -356.24,2795 cw(c-356.24,2817.93) v1@-372.46,2801.72 ; R16.2@-347.77,2788.41 ccw(c-363.68,2772.5) -363.68,2795 ccw(c-363.68,2817.5) R16.2@-347.77,2801.59 ; R16.2@-344.94,2791.24 ccw(c-354.02,2782.16) -354.02,2795 ccw(c-354.02,2807.84) R16.2@-344.94,2798.76 ; v1(4316.85,4944.52) 4349.48,4944.52 4380.67,4975.71 4944.9,4975.71 4972.06,4948.54 5034.33,4948.54 5066.17,4916.71 5113.82,4916.71 5172.15,4975.04 5328.23,4975.04 5356.86,4946.41 5356.86,4848.37 5390.19,4815.04 5390.19,4773.81 5402,4762 5402,4749 5414,4737 5440,4737 5444.88,4732.12 5444.88,4720 5444.88,4710 5444.88,4668 ; v1@4320.74,4940.63 cw(c4330.13,4931.25) 4330.13,4944.52 cw(c4330.13,4957.8) v1@4320.74,4948.41 ; v1@4323.57,4937.81 cw(c4339.79,4921.59) 4339.79,4944.52 cw(c4339.79,4967.46) v1@4323.57,4951.24 ; v3@5428.72,4394.32 ccw(c5427.14,4412.36) 5441.01,4400.72 ccw(c5454.88,4389.08) v3@5436.84,4387.5 ; 5440.76,4400.43 ccw(c5430.83,4410.36) 5444.88,4410.36 5444.88,4503.9 5444.88,4668 ; 5444.88,4675 5444.88,4668
CODEC.I2S_DIN: R17.2 U8.T10 | length 8686.8
  Top Layer w4: v3(5232.52,4071.89) U8.T10@5252.2,4091.57 ; U8.T10@5244.7,4091.57 cw(c5226.6,4091.57) 5239.4,4078.77 cw(c5252.2,4065.97) U8.T10@5252.2,4084.07 ; U8.T10@5244.86,4091.57 cw(c5227.14,4091.57) 5239.67,4079.04 cw(c5252.2,4066.51) U8.T10@5252.2,4084.23 ; 5245.32,4084.69 cw(c5232.52,4097.5) 5232.52,4079.39 ccw(c5232.52,4097.5) 5245.32,4084.69 ; 5245.32,4084.69 ccw(c5258.13,4071.89) 5240.02,4071.89 cw(c5258.13,4071.89) 5245.32,4084.69
  MidLayer1 w4: v1(2231.86,2350.04) 2363.54,2350.04 2380,2366.5 2898.13,2366.5 2965,2433.37 3098.52,2433.37 3148.52,2483.37 3148.52,2833.37 3165.19,2850.04 3215.19,2850.04 3231.86,2833.37 3231.86,2741.71 3298.52,2675.04 3315.19,2675.04 3371,2730.85 3371,3211 3497.52,3337.52 3497.52,3765.1 3507.47,3775.04 3832.19,3775.04 v1(3857.19,3800.04) ; v1@2235.75,2346.15 cw(c2245.14,2336.76) 2245.14,2350.04 cw(c2245.14,2363.32) v1@2235.75,2353.93 ; v1@2238.57,2343.32 cw(c2254.79,2327.11) 2254.79,2350.04 cw(c2254.79,2372.98) v1@2238.57,2356.76 ; v1@3847.69,3800.04 cw(c3824.76,3800.04) 3840.97,3783.82 cw(c3857.19,3767.61) v1@3857.19,3790.54 ; v1@3851.69,3800.04 cw(c3838.41,3800.04) 3847.8,3790.65 cw(c3857.19,3781.26) v1@3857.19,3794.54
  MidLayer2 w4: v4@-471.94,2393.06 cw(c-488.69,2376.31) -465,2376.31 cw(c-441.31,2376.31) v4@-458.06,2393.06 ; v4@-469.11,2395.89 cw(c-479.03,2385.97) -465,2385.97 cw(c-450.97,2385.97) v4@-460.89,2395.89 ; v4(-465,2400) -465,2370.25 -444.46,2349.71 -264.71,2349.71 v4(-245,2330) ; v4@-254.81,2330 ccw(c-278.5,2330) -261.75,2346.75 ccw(c-245,2363.5) v4@-245,2339.81 ; v4@-250.81,2330 ccw(c-264.84,2330) -254.92,2339.92 ccw(c-245,2349.84) v4@-245,2335.81
  Bottom Layer w4: v4@-471.94,2406.94 ccw(c-488.69,2423.69) -465,2423.69 ccw(c-441.31,2423.69) v4@-458.06,2406.94 ; v4@-469.11,2404.11 ccw(c-479.03,2414.03) -465,2414.03 ccw(c-450.97,2414.03) v4@-460.89,2404.11 ; v4(-465,2400) -465,2445 -480,2460 -480,2677.66 -470,2687.66 -462.34,2687.66 -440,2710 -440,2835 -430,2845 R17.2@-341.18,2845 ; R17.2@-347.77,2838.41 ccw(c-363.68,2822.5) -363.68,2845 ccw(c-363.68,2867.5) R17.2@-347.77,2851.59 ; R17.2@-344.94,2841.24 ccw(c-354.02,2832.16) -354.02,2845 ccw(c-354.02,2857.84) R17.2@-344.94,2848.76 ; v4(-245,2330) -180,2330 -170.02,2320.02 2104.61,2320.02 2134.63,2350.04 v1(2231.86,2350.04) ; v4@-240.89,2325.89 cw(c-230.97,2315.97) -230.97,2330 cw(c-230.97,2344.03) v4@-240.89,2334.11 ; v4@-238.06,2323.06 cw(c-221.31,2306.31) -221.31,2330 cw(c-221.31,2353.69) v4@-238.06,2336.94 ; v1@2225.14,2343.32 ccw(c2208.92,2327.11) 2208.92,2350.04 ccw(c2208.92,2372.98) v1@2225.14,2356.76 ; v1@2227.97,2346.15 ccw(c2218.58,2336.76) 2218.58,2350.04 ccw(c2218.58,2363.32) v1@2227.97,2353.93 ; v1(3857.19,3800.04) 3898.33,3800.04 3915,3783.37 3998.52,3783.37 4031.86,3816.71 4148.52,3816.71 4182.19,3850.37 4360.17,3850.37 4400.84,3891.04 4430,3891.04 4448.52,3891.04 4456.86,3899.37 4456.86,3950.04 4481.19,3974.37 4672.86,3974.37 4723.52,4025.04 4800,4025.04 4822.99,4048.03 4860,4048.03 4870,4048.03 5076.1,4048.03 5095.52,4048.03 5169.64,4048.03 5189.14,4048.03 ccw(c5189.14,4089.76) 5218.65,4060.25 ; v1@3861.08,3796.15 cw(c3870.47,3786.76) 3870.47,3800.04 cw(c3870.47,3813.32) v1@3861.08,3803.93 ; v1@3863.91,3793.32 cw(c3880.13,3777.11) 3880.13,3800.04 cw(c3880.13,3822.98) v1@3863.91,3806.76 ; v3@5225.05,4072.54 cw(c5207.01,4074.12) 5218.65,4060.25 ; v3@5231.87,4064.42 ccw(c5230.29,4046.38) 5218.65,4060.25
CODEC.I2S_DOUT: R19.2 U8.AB4 | length 7874.1
  Top Layer w4: v3(4996.3,3835.67) U8.AB4@5015.98,3855.35 ; U8.AB4@5008.48,3855.35 cw(c4990.38,3855.35) 5003.18,3842.55 cw(c5015.98,3829.75) U8.AB4@5015.98,3847.85 ; U8.AB4@5008.64,3855.35 cw(c4990.92,3855.35) 5003.45,3842.82 cw(c5015.98,3830.29) U8.AB4@5015.98,3848.01 ; 5009.1,3848.47 cw(c4996.3,3861.28) 4996.3,3843.17 ccw(c4996.3,3861.28) 5009.1,3848.47 ; 5009.1,3848.47 ccw(c5021.91,3835.67) 5003.8,3835.67 cw(c5021.91,3835.67) 5009.1,3848.47
  MidLayer1 w4: v1@4901.14,2489.09 ccw(c4887.34,2502.9) 4906.86,2502.9 ; 4906.86,2498.07 ccw(c4923.55,2498.07) v1@4911.75,2486.26 ; 4906.86,2507.72 ccw(c4933.21,2507.72) v1@4914.57,2489.09 ; v1(4907.86,2482.37) 4906.86,2483.37 4906.86,2641.71 4923.52,2658.37 4923.52,3194.69 4956.86,3228.02 4956.86,3386.36 4907.52,3435.69 4907.52,3591.71 4882.52,3616.71 4848.52,3616.71 4828.52,3636.71 4828.52,3661.71 4806.86,3683.37 4806.86,3776.04 4799.52,3783.37 4799.52,3826.04 4809.15,3835.67 4860,3835.67 4870,3835.67 4918.62,3835.67 v3(4996.3,3835.67) ; v3@4991.11,3830.48 ccw(c4978.57,3817.94) 4978.57,3835.67 ccw(c4978.57,3853.4) v3@4991.11,3840.86 ; 4978.19,3835.67 cw(c4978.19,3817.56) 4991,3830.37 ccw(c4978.19,3817.56) 4978.19,3835.67 ; 4978.19,3835.67 ccw(c4978.19,3853.78) 4991,3840.97 cw(c4978.19,3853.78) 4978.19,3835.67
  MidLayer2 w4: v1(2180.86,2325.04) 2217.66,2325.04 2225.16,2332.54 2356.48,2332.54 2378.9,2354.96 2394.44,2370.5 2415.56,2370.5 2444.35,2341.71 2740.65,2341.71 2749.44,2350.5 2770.56,2350.5 2779.35,2341.71 3203.19,2341.71 3206.86,2338.04 3270.98,2338.04 3307.98,2375.04 4891.19,2375.04 4907.86,2391.71 v1(4907.86,2482.37) ; v1@2184.75,2321.15 cw(c2194.14,2311.76) 2194.14,2325.04 cw(c2194.14,2338.32) v1@2184.75,2328.93 ; v1@2187.57,2318.32 cw(c2203.79,2302.11) 2203.79,2325.04 cw(c2203.79,2347.98) v1@2187.57,2331.76 ; v1@4901.14,2475.66 cw(c4884.92,2459.44) 4907.86,2459.44 cw(c4930.79,2459.44) v1@4914.57,2475.66 ; v1@4903.97,2478.49 cw(c4894.58,2469.1) 4907.86,2469.1 cw(c4921.14,2469.1) v1@4911.75,2478.49
  Bottom Layer w4: R19.2@-350.5,2544.37 cw(c-370.74,2544.07) -356.43,2529.75 cw(c-343.14,2516.47) R19.2@-341.83,2535.21 ; R19.2@-350.22,2535.96 cw(c-342.33,2528.07) R19.2@-341.55,2539.2 ; R19.2@-349.74,2536.44 ccw(c-357.56,2544.27) R19.2@-346.5,2544.43 ; R19.2@-341.18,2545 -356.18,2530 -389,2530 -422,2497 -422,2390.81 -343.21,2312.02 2112.02,2312.02 2125.04,2325.04 v1(2180.86,2325.04) ; v1@2174.14,2318.32 ccw(c2157.92,2302.11) 2157.92,2325.04 ccw(c2157.92,2347.98) v1@2174.14,2331.76 ; v1@2176.97,2321.15 ccw(c2167.58,2311.76) 2167.58,2325.04 ccw(c2167.58,2338.32) v1@2176.97,2328.93
CODEC.I2S_MCLK: R20.1 U8.G13 | length 13754.6
  Top Layer w4: v3(5350.63,4465.59) U8.G13@5370.31,4445.91 ; U8.G13@5362.81,4445.91 ccw(c5344.71,4445.91) 5357.51,4458.71 ccw(c5370.31,4471.51) U8.G13@5370.31,4453.41 ; U8.G13@5362.97,4445.91 ccw(c5345.25,4445.91) 5357.78,4458.44 ccw(c5370.31,4470.97) U8.G13@5370.31,4453.25 ; 5363.43,4452.79 cw(c5376.24,4465.59) 5358.13,4465.59 ccw(c5376.24,4465.59) 5363.43,4452.79 ; 5363.43,4452.79 ccw(c5350.63,4439.98) 5350.63,4458.09 cw(c5350.63,4439.98) 5363.43,4452.79
  MidLayer1 w4: v4(475,2945) 497.19,2945 ; v4@479.3,2941.09 cw(c488.14,2933.04) 488.14,2945 cw(c488.14,2956.96) v4@479.3,2948.91 ; v4@482.26,2938.4 cw(c497.19,2924.81) 497.19,2945 ; v4@482.26,2951.6 ccw(c497.19,2965.19) 497.19,2945 ; v1@5408.14,4956.76 ccw(c5391.13,4973.77) 5415.19,4973.77 ; v1@5410.97,4953.93 ccw(c5400.79,4964.11) 5415.19,4964.11 ; v1(5414.86,4950.04) 5415.19,4950.04 5415.19,5000.04 5495.86,5080.71 5495.86,5115.73 5470.5,5141.08 5470.5,5180 5470.5,5247.02 5491.76,5268.28 5505.19,5281.71 5573.52,5350.04 5674.19,5450.71 5674.19,5548.13 5694,5567.94 5694,6154.37 5615,6233.37 4825,6233.37 4802,6256.37 4802,6650.37 4713.37,6739 1836.63,6739 1821,6723.37 1821,6589 1890,6520 1890,6433.18 1840.19,6383.37 1370,6383.37 1265.19,6278.56 1265.19,5010.19 1245,4990 601.31,4990 590.19,4978.88 590.19,4680.39 198.19,4288.39 198.19,3866.37 181.86,3850.04 181.86,3497.02 127.18,3442.35 127.18,3408.07 137.75,3397.5 177.5,3397.5 240,3460 610,3460 619,3451 619,3370 584,3335 535,3335 495,3295 495,3230 513.61,3211.39 513.61,2961.42 497.19,2945 ; 5415.19,4962.53 ccw(c5427.35,4962.53) v1@5418.75,4953.93 ; 5415.19,4972.18 ccw(c5437,4972.18) v1@5421.58,4956.76
  MidLayer2 w4: 5339.24,4479.17 cw(c5349.17,4489.1) 5335.12,4489.1 5335.12,4582.64 5335.12,4710 5335.12,4720 5335.12,4724.74 5335.12,4774.99 5378.52,4818.39 5378.52,4858.04 5365.19,4871.37 5365.19,4933.37 5381.86,4950.04 v1(5414.86,4950.04) ; v3@5343.16,4466.24 ccw(c5325.12,4467.82) 5338.99,4479.46 ccw(c5352.86,4491.1) v3@5351.28,4473.06 ; v1@5408.14,4943.32 ccw(c5391.93,4927.11) 5391.93,4950.04 ccw(c5391.93,4972.98) v1@5408.14,4956.76 ; v1@5410.97,4946.15 ccw(c5401.58,4936.76) 5401.58,4950.04 ccw(c5401.58,4963.32) v1@5410.97,4953.93
  Bottom Layer w4: R20.1@-347.77,2888.41 ccw(c-363.68,2872.5) -363.68,2895 ccw(c-363.68,2917.5) R20.1@-347.77,2901.59 ; R20.1@-344.94,2891.24 ccw(c-354.02,2882.16) -354.02,2895 ccw(c-354.02,2907.84) R20.1@-344.94,2898.76 ; R20.1@-341.18,2895 -440,2895 -443.48,2898.48 -443.48,3030.06 -431.5,3042.04 377.96,3042.04 v4(475,2945) ; v4@465.19,2945 ccw(c441.5,2945) 458.25,2961.75 ccw(c475,2978.5) v4@475,2954.81 ; v4@469.19,2945 ccw(c455.16,2945) 465.08,2954.92 ccw(c475,2964.84) v4@475,2950.81
CODEC.I2S_WCLK: R18.1 U8.AF13 | length 7585
  Top Layer w4: v1@5358.47,3406.76 ccw(c5342.26,3422.98) 5365.19,3422.98 ccw(c5388.13,3422.98) v1@5371.91,3406.76 ; v1@5361.3,3403.93 ccw(c5351.91,3413.32) 5365.19,3413.32 ccw(c5378.47,3413.32) v1@5369.08,3403.93 ; U8.AF13@5365.01,3692.57 cw(c5352.21,3679.77) 5370.31,3679.77 cw(c5388.42,3679.77) U8.AF13@5375.62,3692.57 ; U8.AF13@5365.12,3692.68 cw(c5352.59,3680.15) 5370.31,3680.15 cw(c5388.04,3680.15) U8.AF13@5375.51,3692.68 ; v1(5365.19,3400.04) 5365.19,3431.51 5356.7,3440 5356.7,3517.89 5373.52,3534.71 5373.52,3622.79 5370.31,3626 5370.31,3660 5370.31,3670 U8.AF13@5370.31,3697.87
  MidLayer1 w4: v1@5333.47,3284.99 cw(c5317.26,3268.77) 5340.19,3268.77 cw(c5363.13,3268.77) v1@5346.91,3284.99 ; v1@5336.3,3287.82 cw(c5326.91,3278.43) 5340.19,3278.43 cw(c5353.47,3278.43) v1@5344.08,3287.82 ; v1(5340.19,3291.71) 5340.19,3265.69 5390.86,3215.02 5390.86,3163.39 5348.19,3120.73 5348.19,3033.71 5372.52,3009.37 5390.19,2991.71 5390.19,2965.04 v4(5365.19,2940.04) ; v4@5365.19,2945.85 ccw(c5365.19,2959.88) 5375.11,2949.96 ccw(c5385.03,2940.04) v4@5371,2940.04 ; v4@5365.19,2949.85 ccw(c5365.19,2973.54) 5381.94,2956.79 ccw(c5398.69,2940.04) v4@5375,2940.04
  MidLayer2 w4: v1@-374.86,2948.43 ccw(c-391.08,2964.64) -368.14,2964.64 ccw(c-345.21,2964.64) v1@-361.43,2948.43 ; v1@-372.03,2945.6 ccw(c-381.42,2954.99) -368.14,2954.99 ccw(c-354.86,2954.99) v1@-364.25,2945.6 ; v1(-368.14,2941.71) -368.14,3036.9 -363,3042.04 180.33,3042.04 415.37,2807 563.31,2807 626.31,2870 2110.9,2870 2140.05,2840.85 2172.66,2840.85 2215.19,2883.37 2290.19,2883.37 2308.56,2865 2453.29,2865 2488.33,2900.04 4673.52,2900.04 4690.19,2916.71 4715.19,2916.71 4723.52,2908.37 5005,2908.37 5018.37,2895 v4(5085,2895) ; v4@5078.06,2888.06 ccw(c5061.31,2871.31) 5061.31,2895 ccw(c5061.31,2918.69) v4@5078.06,2901.94 ; v4@5080.89,2890.89 ccw(c5070.97,2880.97) 5070.97,2895 ccw(c5070.97,2909.03) v4@5080.89,2899.11
  Bottom Layer w4: v1@-364.25,2937.82 cw(c-354.86,2928.43) -354.86,2941.71 cw(c-354.86,2954.99) v1@-364.25,2945.6 ; v1@-361.43,2934.99 cw(c-345.21,2918.77) -345.21,2941.71 cw(c-345.21,2964.64) v1@-361.43,2948.43 ; v1@-359.24,2941.71 ccw(c-359.24,2960.54) R18.1@-345.16,2948.04 ; v1@-356.92,2941.71 cw(c-356.92,2928.77) R18.1@-347.77,2937.92 ; R18.1@-348.15,2950.69 cw(c-368.14,2968.44) v1(-368.14,2941.71) -341.18,2941.71 -341.18,2944.51 R18.1@-341.18,2945 ; v4(5085,2895) 5100.81,2910.81 5189.31,2910.81 5229.31,2950.81 5250.69,2950.81 5268.62,2932.88 5317.88,2932.88 5325,2940 v4@5365.15,2940 ; v1(5340.19,3291.71) 5361.96,3291.71 ; 5341.41,2940 ccw(c5341.41,2963.83) v4@5358.25,2946.98 ; 5341.6,2940 cw(c5341.6,2916.45) v4@5358.25,2933.1 ; v1@5344.22,3287.97 cw(c5352.79,3280.02) 5352.79,3291.71 cw(c5352.79,3303.4) v1@5344.22,3295.45 ; v1@5347.16,3285.25 cw(c5361.96,3271.52) 5361.96,3291.71 ; v1@5347.16,3298.17 ccw(c5361.96,3311.9) 5361.96,3291.71 ; 5351.06,2940 ccw(c5351.06,2954.17) v4@5361.08,2944.15 ; 5351.26,2940 cw(c5351.26,2926.11) v4@5361.08,2935.93 ; v1@5365.19,3390.54 cw(c5365.19,3367.61) 5381.41,3383.82 cw(c5397.63,3400.04) v1@5374.69,3400.04 ; v1@5365.19,3394.54 cw(c5365.19,3381.26) 5374.58,3390.65 cw(c5383.97,3400.04) v1@5370.69,3400.04 ; v1(5365.19,3400.04) 5390.19,3375.04 5390.19,3319.94 5361.96,3291.71
CODEC.SPI_CLK: U1.10 U8.A14 | length 9939.1
  Top Layer w4: v1(-450,2605) -395,2605 -391.77,2608.23 U1.10@-320,2608.23 ; v1@-446.11,2601.11 cw(c-436.72,2591.72) -436.72,2605 cw(c-436.72,2618.28) v1@-446.11,2608.89 ; v1@-443.28,2598.28 cw(c-427.07,2582.06) -427.07,2605 cw(c-427.07,2627.93) v1@-443.28,2611.72 ; U1.10@-339.74,2604.63 ccw(c-348.42,2595.95) -348.42,2608.23 ccw(c-348.42,2620.51) U1.10@-339.74,2611.83 ; v1(5390.19,4735) 5400.15,4725.04 5409.38,4725.04 ; U8.A14@5404.38,4687.43 ccw(c5391.58,4700.23) 5409.69,4700.23 ccw(c5427.79,4700.23) U8.A14@5414.99,4687.43 ; U8.A14@5404.49,4687.32 ccw(c5391.96,4699.85) 5409.69,4699.85 ccw(c5427.41,4699.85) U8.A14@5414.88,4687.32 ; U8.A14@5409.69,4682.13 5409.69,4710 5409.69,4720 5409.69,4724.74
  MidLayer1 w4: v1@-456.72,2598.28 ccw(c-472.94,2582.06) -472.94,2605 ccw(c-472.94,2627.93) v1@-456.72,2611.72 ; v1@-453.89,2601.11 ccw(c-463.28,2591.72) -463.28,2605 ccw(c-463.28,2618.28) v1@-453.89,2608.89 ; v1(-450,2605) -482.19,2605 -492.19,2615 -492.19,3021.25 -463.39,3050.04 -463.39,3136.61 -450,3150 v1(-395,3150) ; v1@-401.72,3143.28 ccw(c-417.94,3127.06) -417.94,3150 ccw(c-417.94,3172.93) v1@-401.72,3156.72 ; v1@-398.89,3146.11 ccw(c-408.28,3136.72) -408.28,3150 ccw(c-408.28,3163.28) v1@-398.89,3153.89 ; v4@-11.94,3216.94 ccw(c-28.69,3233.69) -5,3233.69 ccw(c18.69,3233.69) v4@1.94,3216.94 ; v4@-9.11,3214.11 ccw(c-19.03,3224.03) -5,3224.03 ccw(c9.03,3224.03) v4@-0.89,3214.11 ; v4(-5,3210) -5,3275 -18.31,3288.31 -18.31,3741.5 15.19,3775 15.19,3833.37 31.86,3850.04 165.19,3850.04 190.19,3875.04 190.19,4291.71 581.86,4683.37 581.86,4981.86 598,4998 1213,4998 v4(1240,5025) v4@1241.69,5023.31 ; v4@1230.19,5025 cw(c1206.5,5025) 1223.25,5008.25 cw(c1240,4991.5) v4@1240,5015.19 ; v4@1234.19,5025 cw(c1220.16,5025) 1230.08,5015.08 cw(c1240,5005.16) v4@1240,5019.19 ; v1@5383.47,4741.72 ccw(c5367.26,4757.93) 5390.19,4757.93 ccw(c5413.13,4757.93) v1@5396.91,4741.72 ; v1@5386.3,4738.89 ccw(c5376.91,4748.28) 5390.19,4748.28 ccw(c5403.47,4748.28) v1@5394.08,4738.89 ; v1(5390.19,4735) 5390.19,4766.71 5423.52,4800.04 5423.52,4903.71 5428.19,4908.37 5453.52,4908.37 5461.15,4916 5475.65,4916 5483.27,4908.37 5506.86,4908.37 5514.75,4900.48 5514.75,4870 5499.75,4855 v4(5460,4855) ; v4@5464.11,4850.89 cw(c5474.03,4840.97) 5474.03,4855 cw(c5474.03,4869.03) v4@5464.11,4859.11 ; v4@5466.94,4848.06 cw(c5483.69,4831.31) 5483.69,4855 cw(c5483.69,4878.69) v4@5466.94,4861.94
  MidLayer2 w4: v1(-395,3150) -335,3210 v4(-5,3210) ; v1@-395,3155.5 ccw(c-395,3168.78) -385.61,3159.39 ccw(c-376.22,3150) v1@-389.5,3150 ; v1@-395,3159.5 ccw(c-395,3182.43) -378.78,3166.22 ccw(c-362.57,3150) v1@-385.5,3150 ; v4@-11.94,3203.06 ccw(c-28.69,3186.31) -28.69,3210 ccw(c-28.69,3233.69) v4@-11.94,3216.94 ; v4@-9.11,3205.89 ccw(c-19.03,3195.97) -19.03,3210 ccw(c-19.03,3224.03) v4@-9.11,3214.11 ; v4(4080,4980) 4165,4980 4275,4870 4314.88,4870 4328,4856.87 4355.77,4856.87 4366.02,4867.13 4366.02,4881.62 4320.62,4927.02 4309.6,4927.02 4299.35,4937.28 4299.35,4955.62 4313.73,4970 ; v4@4084.11,4975.89 cw(c4094.03,4965.97) 4094.03,4980 cw(c4094.03,4994.03) v4@4084.11,4984.11 ; v4@4086.94,4973.06 cw(c4103.69,4956.31) 4103.69,4980 cw(c4103.69,5003.69) v4@4086.94,4986.94 ; v4(4330,4970) 4313.73,4970 ; 4313.74,4970 cw(c4313.74,4961.42) 4321.32,4965.42 ccw(c4313.74,4961.42) 4313.74,4970 ; 4313.74,4970 ccw(c4313.74,4978.58) 4321.32,4974.58 cw(c4313.74,4978.58) 4313.74,4970
  Bottom Layer w4: v4(1240,5025) 1320.45,5025 1369.92,4975.54 3808.99,4975.54 3817.98,4966.54 3871.54,4966.54 3895,4990 4070,4990 v4(4080,4980) ; v4(4330,4970) 4363.65,4970 4377.35,4983.71 4948.21,4983.71 4975.38,4956.54 5037.65,4956.54 5069.31,4924.87 5110.67,4924.87 5168.84,4983.04 5331.54,4983.04 5365.52,4949.06 5365.52,4854.73 5402.75,4817.5 5422.5,4817.5 v4(5460,4855) ; v4@4334.11,4965.89 cw(c4344.03,4955.97) 4344.03,4970 cw(c4344.03,4984.03) v4@4334.11,4974.11 ; v4@4336.94,4963.06 cw(c4353.69,4946.31) 4353.69,4970 cw(c4353.69,4993.69) v4@4336.94,4976.94 ; v4@5450.19,4855 cw(c5426.5,4855) 5443.25,4838.25 cw(c5460,4821.5) v4@5460,4845.19 ; v4@5454.19,4855 cw(c5440.16,4855) 5450.08,4845.08 cw(c5460,4835.16) v4@5460,4849.19
CODEC.SPI_CS_N: U1.11 U8.AE9 | length 7988.4
  Top Layer w4: v1(-455,2575) -423.03,2575 -415,2583.03 U1.11@-320,2583.03 ; v1@-451.11,2571.11 cw(c-441.72,2561.72) -441.72,2575 cw(c-441.72,2588.28) v1@-451.11,2578.89 ; v1@-448.28,2568.28 cw(c-432.07,2552.06) -432.07,2575 cw(c-432.07,2597.93) v1@-448.28,2581.72 ; U1.11@-339.74,2579.43 ccw(c-348.42,2570.75) -348.42,2583.03 ccw(c-348.42,2595.31) U1.11@-339.74,2586.63 ; v1(5114.19,3450.04) 5133.86,3450.04 ; v1@5121.63,3444.14 cw(c5133.86,3434.44) 5133.86,3450.04 ; v1@5121.63,3455.95 ccw(c5133.86,3465.65) 5133.86,3450.04 ; U8.AE9@5205.49,3737.24 cw(c5187.77,3737.24) 5200.3,3724.71 ; U8.AE9@5212.83,3729.9 ccw(c5212.83,3712.17) 5200.3,3724.71 ; 5133.86,3450.04 5189.57,3505.76 5198.02,3514.21 5198.02,3573.85 5193.02,3578.85 5193.02,3613.23 5197.33,3617.53 5197.33,3660 5197.33,3670 5197.33,3717.53 cw(c5207.48,3717.53) 5200.3,3724.71
  MidLayer1 w4: v1(3313.19,2339.71) 3342.29,2368.81 3391.69,2368.81 3615.37,2592.49 3680,2657.12 ; v1@3313.19,2345.21 ccw(c3313.19,2358.49) 3322.58,2349.1 ccw(c3331.97,2339.71) v1@3318.69,2339.71 ; v1@3313.19,2349.21 ccw(c3313.19,2372.14) 3329.41,2355.93 ccw(c3345.63,2339.71) v1@3322.69,2339.71 ; v1@3673.3,2673.27 cw(c3657.21,2657.13) 3680,2657.13 ; v1@3676.12,2676.1 cw(c3666.81,2666.76) 3680,2666.76 cw(c3693.19,2666.76) v1@3683.88,2676.1 ; v1(3680,2680) 3680,2657.12 ; v1@3686.7,2673.27 ccw(c3702.79,2657.13) 3680,2657.13 ; 5056.98,2750.37 cw(c5056.98,2725.16) v1@5074.81,2742.99 ; 5060.2,2750.37 ccw(c5060.2,2771.03) v1@5074.81,2756.43 ; 5066.64,2750.37 cw(c5066.64,2734.82) v1@5077.64,2745.82 ; 5069.86,2750.37 ccw(c5069.86,2761.38) v1@5077.64,2753.6 ; v1(5081.52,2749.71) 5081.52,2750.37 5045.82,2750.37 4990.19,2806 4990.19,3138.33 5031.86,3180 5031.86,3283.37 5015.19,3300.04 4997.19,3318.04 4997.19,3373.43 5044.26,3420.5 5109.69,3420.5 5114.19,3425 v1(5114.19,3450.04) ; v1@5107.47,3443.32 cw(c5091.26,3427.11) 5114.19,3427.11 cw(c5137.13,3427.11) v1@5120.91,3443.32 ; v1@5110.3,3446.15 cw(c5100.91,3436.76) 5114.19,3436.76 cw(c5127.47,3436.76) v1@5118.08,3446.15
  MidLayer2 w4: v1@-464.5,2575 cw(c-487.44,2575) -471.22,2558.78 cw(c-455,2542.56) v1@-455,2565.5 ; v1@-460.5,2575 cw(c-473.78,2575) -464.39,2565.61 cw(c-455,2556.22) v1@-455,2569.5 ; v1(-455,2575) -485,2545 -485,2460 -382.71,2357.71 -122.29,2357.71 -110,2370 -90,2370 -28.37,2308.37 1631.86,2308.37 1640.19,2300.04 2203.98,2300.04 2228.48,2324.54 2359.79,2324.54 2387.5,2352.25 2397.75,2362.5 2412.25,2362.5 2441.37,2333.37 2743.63,2333.37 2752.75,2342.5 2767.25,2342.5 2776.37,2333.37 3198.52,2333.37 3201.9,2330 3275,2330 3284.71,2339.71 v1(3313.19,2339.71) ; v1@3306.47,2332.99 ccw(c3290.26,2316.77) 3290.26,2339.71 ccw(c3290.26,2362.64) v1@3306.47,2346.43 ; v1@3309.3,2335.82 ccw(c3299.91,2326.43) 3299.91,2339.71 ccw(c3299.91,2352.99) v1@3309.3,2343.6 ; v1(3680,2680) 3758.71,2758.71 4078,2758.71 4145,2691.71 4848.52,2691.71 4906.52,2749.71 v1(5081.52,2749.71) ; v1@3680,2685.5 ccw(c3680,2698.78) 3689.39,2689.39 ccw(c3698.78,2680) v1@3685.5,2680 ; v1@3680,2689.5 ccw(c3680,2712.43) 3696.22,2696.22 ccw(c3712.43,2680) v1@3689.5,2680 ; v1@5074.81,2742.99 ccw(c5058.59,2726.77) 5058.59,2749.71 ccw(c5058.59,2772.64) v1@5074.81,2756.43 ; v1@5077.64,2745.82 ccw(c5068.25,2736.43) 5068.25,2749.71 ccw(c5068.25,2762.99) v1@5077.64,2753.6
CODEC.SPI_DIN: U1.12 U8.T4 | length 7725.8
  Top Layer w4: v1(-370,2555) -367.17,2557.83 U1.12@-320,2557.83 ; v1@-366.11,2551.11 cw(c-349.88,2534.88) -349.88,2557.83 ; v1@-363.28,2548.28 cw(c-340.22,2525.22) U1.12@-340.22,2557.83 ; v1@-363.28,2561.72 ccw(c-353.91,2571.09) -353.91,2557.83 ; U1.12@-339.74,2554.24 ccw(c-348.42,2545.55) -348.42,2557.83 ccw(c-348.42,2570.11) U1.12@-339.74,2561.43 ; v3(4996.3,4071.89) U8.T4@5015.98,4091.57 ; U8.T4@5008.48,4091.57 cw(c4990.38,4091.57) 5003.18,4078.77 cw(c5015.98,4065.97) U8.T4@5015.98,4084.07 ; U8.T4@5008.64,4091.57 cw(c4990.92,4091.57) 5003.45,4079.04 cw(c5015.98,4066.51) U8.T4@5015.98,4084.23 ; 5009.1,4084.69 cw(c4996.3,4097.5) 4996.3,4079.39 ccw(c4996.3,4097.5) 5009.1,4084.69 ; 5009.1,4084.69 ccw(c5021.91,4071.89) 5003.8,4071.89 cw(c5021.91,4071.89) 5009.1,4084.69
  MidLayer1 w4: v1@2753.28,2318.28 cw(c2737.06,2302.06) 2760,2302.06 cw(c2782.93,2302.06) v1@2766.72,2318.28 ; v1@2756.11,2321.11 cw(c2746.72,2311.72) 2760,2311.72 cw(c2773.28,2311.72) v1@2763.89,2321.11 ; v1(2760,2325) 2760,2224.5 2829,2155.5 3157.65,2155.5 3189.18,2187.03 3331.86,2329.71 3331.86,2338.37 3348.13,2354.65 3354.29,2360.81 3395,2360.81 3706.86,2672.67 3706.86,3191.71 4041.19,3526.04 4068.19,3526.04 4094.23,3500 4123.48,3500 4151.48,3528 4206.84,3528 4232.19,3553.35 4232.19,3769.71 4210.19,3791.71 4184.8,3791.71 4173.52,3802.98 4173.52,3878.52 4240,3945 4240,3995.93 4343.78,4099.71 4626.84,4099.71 4630.84,4095.71 4702.4,4095.71 4710.61,4103.92 4731.99,4103.92 4740.2,4095.71 4752.84,4095.71 4756.84,4091.71 4785,4091.71 4809.84,4091.71 4829.66,4071.89 4860,4071.89 4870,4071.89 4918.62,4071.89 v3(4996.3,4071.89) ; v3@4991,4066.59 ccw(c4978.19,4053.78) 4978.19,4071.89 ccw(c4978.19,4090) v3@4991,4077.19 ; v3@4991.11,4066.7 ccw(c4978.57,4054.16) 4978.57,4071.89 ccw(c4978.57,4089.62) v3@4991.11,4077.08
  Bottom Layer w4: v1@-376.72,2548.28 ccw(c-392.94,2532.06) -392.94,2555 ccw(c-392.94,2577.93) v1@-376.72,2561.72 ; v1@-373.89,2551.11 ccw(c-383.28,2541.72) -383.28,2555 ccw(c-383.28,2568.28) v1@-373.89,2558.89 ; v1(-370,2555) -415,2555 -430,2540 -430,2387.5 -346.52,2304.02 2207.96,2304.02 2229.44,2325.5 2759.5,2325.5 v1(2760,2325)
CODEC.SPI_DOUT: U1.9 U8.AE2 | length 7513.4
  Top Layer w4: U1.9@-320,2633.43 -268.17,2633.42 -252.25,2617.5 -188.27,2617.5 v1(-159.81,2589.04) ; U1.9@-300.26,2629.83 cw(c-291.58,2621.15) -291.58,2633.42 cw(c-291.58,2645.71) U1.9@-300.26,2637.02 ; v1@-169.31,2589.04 ccw(c-192.24,2589.04) -176.03,2605.26 ccw(c-159.81,2621.48) v1@-159.81,2598.54 ; v1@-165.31,2589.04 ccw(c-178.59,2589.04) -169.2,2598.43 ccw(c-159.81,2607.82) v1@-159.81,2594.54 ; 4866.04,3474.19 4852.19,3488.04 ; v1@4872.36,3458.37 ccw(c4849.42,3458.37) 4865.64,3474.59 ccw(c4881.86,3490.81) v1@4881.86,3467.87 ; v1@4876.36,3458.37 ccw(c4863.08,3458.37) 4872.47,3467.76 ccw(c4881.86,3477.15) v1@4881.86,3463.87 ; v1(4881.86,3458.37) 4852.19,3488.04 ; 4852.19,3488.04 4852.19,3587.04 4870.15,3605 4885,3605 4921.74,3641.74 4921.74,3655.26 4921.74,3660 4921.74,3670 4921.74,3717.53 ; 4921.74,3717.53 cw(c4931.89,3717.53) 4924.71,3724.71 ; 4921.74,3717.53 cw(c4931.89,3717.53) 4924.71,3724.71 ; 4924.71,3724.71 cw(c4937.24,3712.17) 4937.24,3729.9 ccw(c4937.24,3712.17) 4924.71,3724.71 ; 4924.71,3724.71 ccw(c4912.17,3737.24) 4929.9,3737.24 cw(c4912.17,3737.24) 4924.71,3724.71
  MidLayer1 w4: 4857,2418.57 4857.19,2418.37 ; 4857,2494 4857.19,2494 ; v1@4875.14,3451.66 cw(c4858.92,3435.44) 4881.86,3435.44 cw(c4904.79,3435.44) v1@4888.57,3451.66 ; v1@4877.97,3454.49 cw(c4868.58,3445.1) 4881.86,3445.1 cw(c4895.14,3445.1) v1@4885.75,3454.49 ; v1(4881.86,3458.37) 4881.86,3358.98 4906.52,3334.32 4906.52,3266.37 4898.52,3258.37 4898.52,2732.04 4857.19,2690.71 4857.19,2521 4857.19,2494 ; v1@4899.36,2366.71 ccw(c4876.42,2366.71) 4892.64,2382.93 ; v1@4903.36,2366.71 ccw(c4890.08,2366.71) 4899.47,2376.1 ccw(c4908.86,2385.49) v1@4908.86,2372.21 ; v1@4908.86,2376.21 cw(c4908.86,2399.14) 4892.64,2382.93 ; 4857.19,2418.37 4892.64,2382.93 ; 4857.19,2418.37 4857.19,2494
  MidLayer2 w4: v1@2405,2335.5 cw(c2405,2312.56) 2421.22,2328.78 cw(c2437.43,2345) v1@2414.5,2345 ; v1@2405,2339.5 cw(c2405,2326.22) 2414.39,2335.61 cw(c2423.78,2345) v1@2410.5,2345 ; v1(2405,2345) 2442.5,2307.5 3364.32,2307.5 3365.19,2308.37 3423.52,2366.71 v1(4908.86,2366.71)
  Bottom Layer w4: v1@-166.53,2582.32 cw(c-182.74,2566.11) -159.81,2566.11 cw(c-136.87,2566.11) v1@-153.09,2582.32 ; v1@-163.7,2585.15 cw(c-173.09,2575.76) -159.81,2575.76 cw(c-146.53,2575.76) v1@-155.92,2585.15 ; v1(-159.81,2589.04) -159.81,2337.83 -150,2328.02 2101.29,2328.02 2148.31,2375.04 2245,2375.04 2275.04,2345 v1(2405,2345) ; v1@2398.28,2338.28 ccw(c2382.06,2322.06) 2382.06,2345 ccw(c2382.06,2367.93) v1@2398.28,2351.72 ; v1@2401.11,2341.11 ccw(c2391.72,2331.72) 2391.72,2345 ccw(c2391.72,2358.28) v1@2401.11,2348.89